# Altium PCB Main.PcbDoc (part 2 of 2)
Units mm, origin at the board's own origin, x right, y up, seen from the top; angles counter-clockwise.
Board outline 200 x 100 mm, 2 copper layers (Top Layer, Bottom Layer), stack 1.57 mm thick; 127 components, 91 nets, 374 pads, 81 vias.
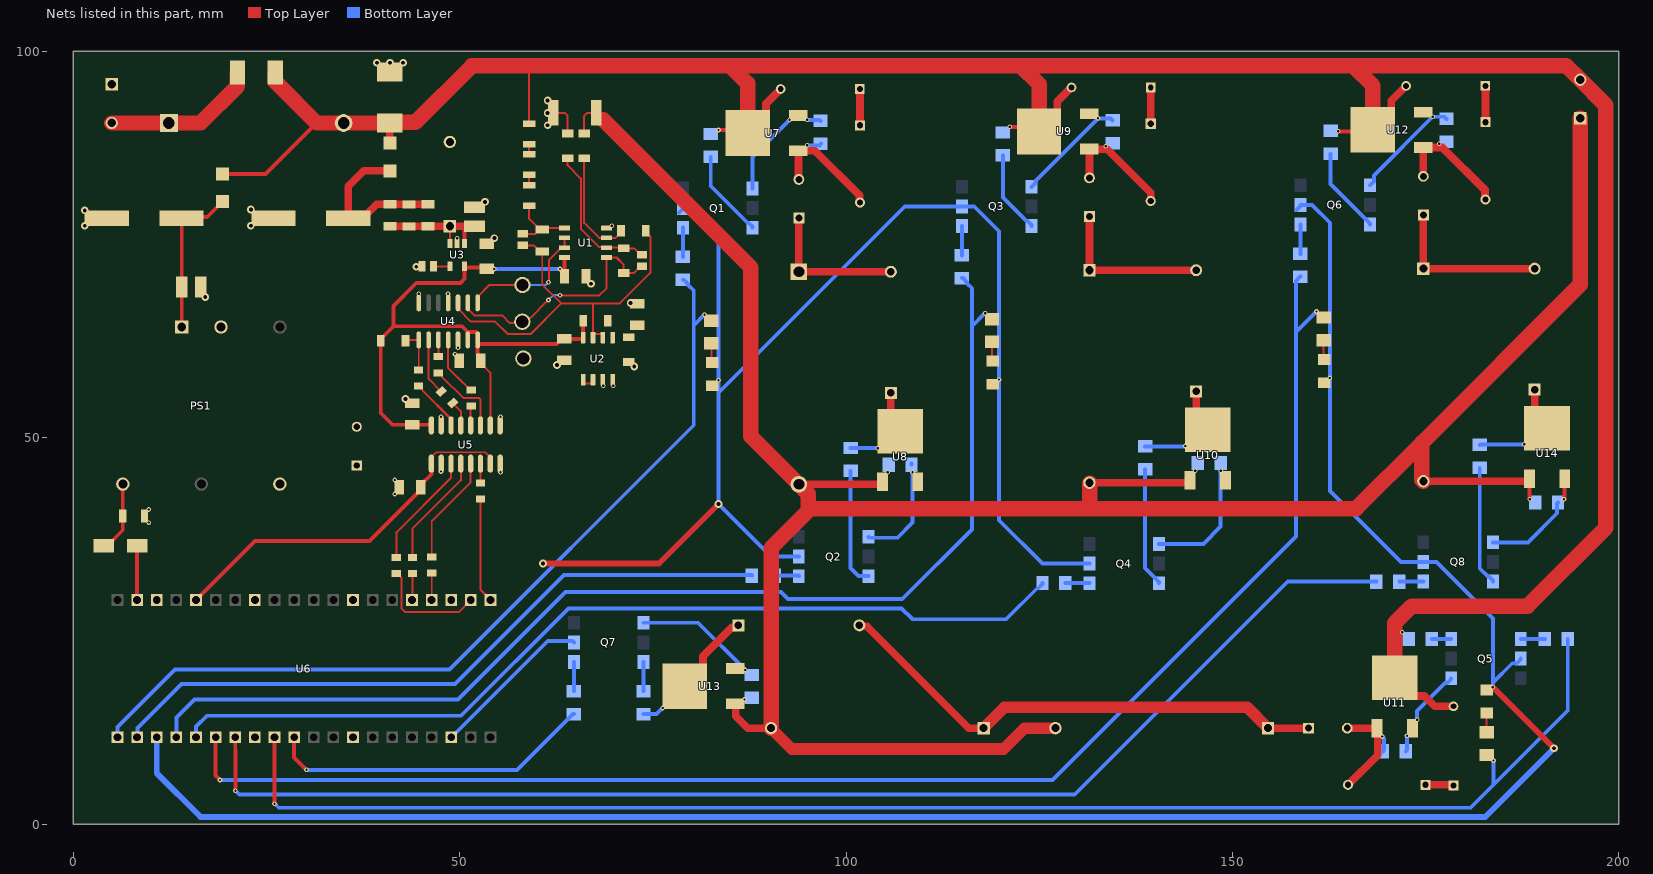
[diagram p2: the nets of this part, all layers, seen from the top]

## Part data (continued)
R15 R16 R17 R18 R19 R20 R21 R22: library part CMP-03412-000516-1, "RES SMD 33 OHM 0.1% 1/8W 0805", Manufacturer=Yageo, Manufacturer Part Number=RT0805BRD0733RL, Package=RT0805, Power Rating=0.125W, Resistance=33Ω, Temperature="-55°C to +155°C", Temperature Coefficient="25 ppm/°C", Temperature Range High=+155°C, Temperature Range Low=-55°C, Tolerance=0.0025, Voltage Rating=150V, Automotive=No, Category=Res, ComponentLink2Description=Datasheet, ComponentLink2URL=http://www.yageo.com/documents/recent/PYu-RT_1-to-0.01_RoHS_L_9.pdf, Composition="Thin Film", Device Class L1="Passive Components", Device Class L2=Resistors, Device Class L3="Chip SMD Resistors", Digikey Description="RES SMD 33 OHM 0.1% 1/8W 0805", Footprint Url=http://www.yageo.com/exep/pages/download/literatures/PYu-R_Mount_10.pdf, Height=0.6mm, Ipc Land Pattern Name=RESC200125X50, Lead Free=Yes, Mouser Description="Res Thin Film 0805 33 Ohm 0.1% 1/8W ±25ppm/°C Molded SMD SMD Paper T/R", Octopart=https://octopart.com/rt0805brd0733rl-yageo-1409436, RoHS=TRUE, Series=RT
R23 R24 R26 R27 R29 R30 R31 R32 R33 R35 R36 R38 R39 R40 R41 R42 R43 R44 R47 R48 R49 R50 R53 R54 R55 R56 R57 R58: library part CMP-26527-006451-1, "330Ω ±5% 0.25W 1206 Thick Film Chip Resistor AEC-Q200 compliant", Case/Package=1206, Max Operating Temperature=155°C, Max Power Dissipation=250mW, Min Operating Temperature=-55°C, Resistance=330R, Resistor Type="Thick Film", Temperature Coefficient=200ppm/°C, Tolerance=5%, Construction=Rectangular, Contact Plating=Tin, Depth=1.6mm, Features="Automotive AEC-Q200", Height=0.028inch, Length=0.126inch, Military Standard=Not, Mount="Surface Mount", Number of Terminations=2, Packaging="Tape and Reel", Radiation Hardening=No, RoHS Compliant=Yes, Series=RMCF, Width=0.063inch
R25 R34 R45 R46: library part CMP-02408-000025-1, "RES.WIREWOUND 1W-S 39 Ohms ±5% Axial Standard THT", Case/Package=Ceramic, Max Operating Temperature=250°C, Min Operating Temperature=-65°C, Power Rating=1W, Resistance=39R, Resistor Type=Wirewound, Temperature Coefficient=90ppm/°C, Tolerance=1%, Construction=Cylindrical, Contact Plating=Tin, Diameter=2.16mm, Lead Free="Lead Free", Length=7.14mm, Military Standard=Not, Mount="Through Hole", Packaging="Tape and Reel", Radiation Hardening=No, RoHS Compliant=Yes, Series=G, Termination=Axial
R28 R37 R51 R52: library part CMP-00030-42817933-1, "RES.WIREWOUND 2W-S 100 Ohms ±5% Axial Standard THT KNP02SJ0101A10", Case/Package=Conformal, Max Operating Temperature=155°C, Min Operating Temperature=-55°C, Operating Supply Voltage=500V, Power Rating=2W, Resistance=100kΩ, Temperature Coefficient=250ppm/°C, Tolerance=5%, Composition="Metal Film", Contact Plating=Tin, Diameter=3.9mm, Lead Free="Lead Free", Length=12mm, Military Standard=Not, Mount="Through Hole", NexarPartId=42817933, Radiation Hardening=No, REACH SVHC="No SVHC", RoHS=Compliant, Schedule B="8533210090, 8533210090", Termination=Axial, Voltage Rating=500V, Voltage Rating (DC)=500V, Width=3.9mm
TP1: library part CMP-1672-00003-4, "Test Point, Black, Through Hole, RoHS, Bulk", Colour=Black, Manufacturer=Keystone, Package Quantity=100, ComponentLink1Description="Manufacturer URL", ComponentLink1URL=http://www.keyelco.com/, ComponentLink2Description=Datasheet, ComponentLink2URL=http://www.keyelco.com/product-pdf.cfm?p=1320, Contact Material=Bronze, Contact Plating=Silver, DatasheetVersion="Rev. F, 12/2013", Height="8.12 mm", Mount="Through Hole", Mounting Technology="Through Hole", PackageDescription="1-Pin Through Hole Device, Dia 3.17 mm", PackageReference=5011, Packaging=Bulk, Pins=1, REACH SVHC="No SVHC", RoHSCompliant=true
TP2: library part CMP-1672-00005-4, "Test Point, Orange, Through Hole, RoHS, Bulk", Colour=Orange, Manufacturer=Keystone, Package Quantity=100, ComponentLink1Description="Manufacturer URL", ComponentLink1URL=http://www.keyelco.com/, ComponentLink2Description=Datasheet, ComponentLink2URL=http://www.keyelco.com/product-pdf.cfm?p=1322, Contact Material=Bronze, Contact Plating=Silver, DatasheetVersion="Rev. F, 12/2013", Height="8.12 mm", Mount="Through Hole", Mounting Technology="Through Hole", PackageDescription="1-Pin Through Hole Device, Dia 3.17 mm", PackageReference=5013, Packaging=Bulk, REACH SVHC="No SVHC", RoHSCompliant=True
TP3: library part CMP-1672-00006-4, "Test Point, Yellow, Through Hole, RoHS, Bulk", Colour=Yellow, Manufacturer=Keystone, Package Quantity=100, ComponentLink1Description="Manufacturer URL", ComponentLink1URL=http://www.keyelco.com/, ComponentLink2Description=Datasheet, ComponentLink2URL=http://www.keyelco.com/product-pdf.cfm?p=1323, Contact Material=Bronze, Contact Plating=Silver, DatasheetVersion="Rev. F, 12/2013", Height="8.12 mm", Mount="Through Hole", Mounting Technology="Through Hole", PackageDescription="1-Pin Through Hole Device, Dia 3.17 mm", PackageReference=5014, Packaging=Bulk, REACH SVHC="No SVHC", RoHSCompliant=true
U1 U2: library part CMP-0272-00762-3, "17 uA, MicroPower, Precision, Zero Drift CMOS Operational Amplifier, 1.8 to 5.5 V, -40 to 125 degC, 8-pin SOIC (D8), Green (RoHS & no Sb/Br)", Manufacturer="Texas Instruments", Total Supply Voltage(Max)(+5V is 5, +/-5V is 10)=5.5, Total Supply Voltage(Min)(+5V is 5, +/-5V is 10)=1.8, CMRR(Min)(dB)=106, Code_JEDEC=MS-012, ComponentLink1Description="Manufacturer URL", ComponentLink1URL=http://www.ti.com/, ComponentLink2Description=Datasheet, ComponentLink2URL=http://www.ti.com/general/docs/lit/getliterature.tsp?genericPartNumber=OPA2333&fileType=pdf, ComponentLink3Description="Package Specification", ComponentLink3URL=http://www.ti.com/litv/pdf/msoi002j, DatasheetVersion=SBOS351C, Eco-Plan="Green (RoHS & no Sb/Br)", IIB(Max)(pA)=200, Iq per channel(Max)(mA)=0.025, Mounting Technology="Surface Mount", Number Of Channels=2, Offset Drift(Typ)(uV/C)=0.02, PackageDescription="8-Pin Plastic Small Outline, Body 4.9 x 3.9 mm, Pitch 1.27 mm", PackageReference=D0008A, PackageVersion="4040047-3/M, 06/2011", PartNumber=OPA2333AIDR, Slew Rate(Typ)(V/us)=0.16, Sub Family="Low Offset Voltage Amplifier (<=500uV), Low Power Amp (<=500uA), Low Supply Voltage Amplifier (<=2.7V), Precision Amplifier, Zero Drift Precision Amplifier", Vio (25C)(Max)(mV)=0.01
U3: library part CMP-0758-00080-2, "Single Output Low Noise LDO, 150 mA, Fixed 3.3 V Output, 1.5% Tolerance, 2.2 to 16 V Input, Low IQ, 5-Pin SOT-23 (DBV), -40 to 125 degC, Green (RoHS & no Sb/Br), Tape and Reel", Manufacturer="Texas Instruments", Operating Temperature Range (degC)="-40 to 125", Accuracy (%)=1.5, ComponentLink1Description="Manufacturer URL", ComponentLink1URL=http://www.ti.com/, ComponentLink2Description=Datasheet, ComponentLink2URL=http://www.ti.com/lit/ds/symlink/lp2985-50.pdf, ComponentLink3Description="Package Specification", ComponentLink3URL=http://www.ti.com/litv/pdf/mpds018j, DatasheetVersion=SLVS522N, Fixed Output Options (V)=3.3, Iout (Max) (A)=0.15, Iq (Typ) (mA)=0.85, Mounting Technology="Surface Mount", Output Options="Fixed Output", PackageDescription="5-Pin Plastic Small Outline, Body 2.9 x 1.6 mm, Pitch 0.95 mm", PackageReference=DBV0005A, PackageVersion=4073253-4/L, Packing="Tape and Reel", PartNumber=LP2985-33DBVR, RoHS=TRUE, Vdo (Typ) (mV)=280, Vin (V)="2.2 to 16"
U4: library part CMP-0188-00363-2, "2.7V 4-Channel/8-Channel 12-Bit A/D Converters with SPI Serial Interface, 14-Pin SOIC 150mil, C Performance Grade, Industrial Temperature, Tape and Reel", Code_IPC=SOIC127P600-14, Code_JEDEC=MS-012-AB, ComponentLink1Description="Manufacturer URL", ComponentLink1URL=http://www.microchip.com/, ComponentLink2Description=Datasheet, ComponentLink2URL=http://ww1.microchip.com/downloads/en/DeviceDoc/21298e.pdf, ComponentLink3Description="Package Specification", ComponentLink3URL=http://www.microchip.com/stellent/groups/techpub_sg/documents/packagingspec/en012702.pdf, DatasheetVersion="revE, Sep-2008", PackageDescription="14-Lead Plastic Small Outline (SL) - Narrow, 3.90mm Body [SOIC]", PackageReference=SOIC-SL14, PackageVersion="revBB, Aug-2009", RevisionNote="URLs added."
U5: library part CMP-0512-00190-1, "Low-Power Quad-Channel Digital Isolator, 150 Mbps, 3.75 kVRMS Isolation Rating, -40 to 125 degC, 16-pin SOIC", Isolation Rating (kV)=3.75, Manufacturer="Silicon Labs", 10kV surge=FALSE, AEC-Q100=FALSE, Channel Type=Unidirectional, Code_IPC=J-STD-020, Code_JEDEC=MS-012, ComponentLink1Description="Manufacturer URL", ComponentLink1URL=http://www.silabs.com/, ComponentLink2Description=Datasheet, ComponentLink2URL=http://www.silabs.com/Support%20Documents/TechnicalDocs/Si864x.pdf, ComponentLink3Description="Package Specification", ComponentLink3URL=http://www.silabs.com/Support%20Documents/TechnicalDocs/si2401.pdf, DatasheetVersion="Rev. 1.5", Enable Control=TRUE, Maximum Data Rate (Mbps)=150, Maximum Propagation Delay (ns)=13, Mounting Technology="Surface Mount", PackageDescription="16-Pin Small-Outline Integrated Circuit, Body 9.9 x 3.9 mm, Pitch 1.27 mm", PackageReference=SOIC-16-NB, PartNumber=Si8641BC-B-IS1, Sub-Family=Isolators
U6: library part CMP-007-000000-1, "Raspberry Pi Board, Arm Cortex-M0+; Core Architecture:Arm; Core Sub-Architecture:Cortex-M0+; Kit Contents:Raspberry Pi Pico Board; No. Of Bits:32Bit; Silicon Core Number:Rp2040; Silicon Manufacturer:Raspberry Pi", Package=None, Check_prices=https://www.snapeda.com/parts/RASPBERRY%20PI%20PICO/Raspberry+Pi/view-part/?ref=eda, Component Type=Standard, Design Item ID=RASPBERRY_PI_PICO, MF="Raspberry Pi", MP="RASPBERRY PI PICO", Pin Count=40, SnapEDA_Link=https://www.snapeda.com/parts/RASPBERRY%20PI%20PICO/Raspberry+Pi/view-part/?ref=snap, Source=RASPBERRY_PI_PICO.SchLib
U7 U8 U9 U10 U11 U12 U13 U14: library part CMP-070-000000-1, "TRIAC Logic - Sensitive Gate 600 V 4 A Surface Mount DPAK", Package="TO-252-3 WeEn Semiconductors", Check_prices=https://www.snapeda.com/parts/BT136S-600E,118/WeEn+Semiconductors/view-part/?ref=eda, Component Type=Standard, Design Item ID=BT136S-600E,118, MF="WeEn Semiconductors", MP=BT136S-600E,118, Pin Count=3, SnapEDA_Link=https://www.snapeda.com/parts/BT136S-600E,118/WeEn+Semiconductors/view-part/?ref=snap, Source=BT136S-600E,118.SchLib

## Via types
v1: diameter 0.6, hole 0.3, Top Layer to Bottom Layer, 59 vias
v2: diameter 1, hole 0.5, Top Layer to Bottom Layer, 22 vias

## Nets (pads, with @x,y where several pads share a name; then routed paths per layer and width w, separated by ;. In a path a pad name is that pad's centre, name@x,y a point inside that pad or via, vN(x,y) a via of type N, cw(c..) or ccw(c..) an arc to the next point about the centre after c; other vN are vias at no path point)
+1V65: C25.1 R5.1 R7.1 U2.6 U2.7 U4.3 | length 52.8
  Top Layer w0.254: U4.3@49.802,67.437 49.802,66.637 51.439,65 54.616,65 56.216,63.4 59.2,63.4 63.15,67.35 ; C25.1@58.165,74.86 59.586,74.86 60.373,74.073 R7.1@60.7,74.073 60.7,69.8 63.15,67.35 ; U2.7@67.265,62.925 U2.7@67.265,63.227 ; U2.6@68.535,62.925 68.535,63.227 68.362,63.4 67.438,63.4 U2.7@67.265,63.227 ; R5.1@74.079,76.756 74.079,76.506 74.452,76.133 74.551,76.133 74.7,75.985 74.7,71.3 70.75,67.35 67.3,67.35 ; 63.15,67.35 67.3,67.35 ; U2.7@67.265,63.227 67.265,67.315 67.3,67.35
+3V3_A: C1.1 C3.1 C4.2 C8.1 C10.1 R10.2 R59.2 U1.8 U2.8 U3.5 U4.13 U4.14 U5.10 U5.16 | length 89.7
  Top Layer w0.254: C10.1@52.739,59.928 52.739,59.608 53.975,58.372 U5.10@53.975,51.575
  Top Layer w0.5: U5.16@46.355,51.575 46.277,51.653 C8.1@43.871,51.653 41.347,51.653 39.803,53.197 R59.2@39.803,62.521 39.803,62.771 41.432,64.4 ; U3.5@50.642,72.085 50.717,72.01 53.383,72.01 C4.2@53.533,71.859 ; U3.5@50.642,72.16 50.642,70.542 50.1,70 44.4,70 41.432,67.032 41.432,64.4 ; U4.13@51.118,61.818 51.072,61.864 U4.13@51.072,62.637 51.053,62.656 U4.13@51.053,63.647 ; U4.14@52.296,61.818 U4.14@52.342,61.864 ; U4.14@52.342,61.855 52.342,60.901 52.379,60.864 52.379,60.288 C10.1@52.739,59.928 ; C1.1@63.575,70.863 U1.8@63.575,73.295 ; R10.2@65.991,65.129 R10.2@65.991,65.129 65.993,62.816 65.945,62.768 63.241,62.768 62.573,62.1 52.388,62.1 52.342,62.146 52.342,63.41 52.105,63.647 U4.13@51.053,63.647 ; 41.432,64.4 50.3,64.4 U4.13@51.053,63.647
  Bottom Layer w0.5: v1(54.5,71.8) v1(63,71.8)
+3V3_D: C9.1 U5.1 U5.7 U6.3V3 | length 48.4
  Top Layer w0.254: U5.1@46.355,46.625 46.355,47.45 47.005,48.1 53.325,48.1 53.975,47.45 U5.7@53.975,46.625
  Top Layer w0.5: U6.3V3@15.9,28.99 23.51,36.6 38.333,36.6 45.004,43.271 C9.1@45.004,43.591 ; C9.1@45.004,43.911 46.346,45.253 46.346,46.616 U5.1@46.355,46.625
+5V: C11.1 D4.1 PS1.6 | length 9.3
  Top Layer w0.5: D4.1@3.98,36 4.43,36 6.43,38 C11.1@6.43,39.861 PS1.6@6.43,43.98
AGND: C1.2 C2.2 C3.2 C4.1 C5.2 C6.2 C7.2 C8.2 C10.2 C12.2 C13.2 C23.2 D1.2 D3.2 J1.1 PS1.2 R2.1 R8.1 R11.1 TP1.1 U1.4 U2.3 U2.4 U3.2 U4.4 U4.7 U4.12 U5.9 U5.15 | length 4.3
  Top Layer w0.254: R2.1@62.125,92 63.6,92 63.975,91.625 R8.1@63.975,89.346
  other v1: 47.6,52.7 55.3,52.7 68.6,56.7 69.9,56.7 49.4,60.8 49.8,61.6 44.7,68.6 48.5,68.6 49.7,75.8 69.7,77.4
  other v2: 43,55 72.6,59.2 62.6,59.4 72.134,67.4 17.1,68.2 67,69.9 44.4,72.1 54.5,75.8 1.5,77.4 23,77.4 1.5,79.4 23,79.5 53.3,80.5 61.4,90.4 61.4,92 61.4,93.6 39.3,98.5 41,98.5 42.7,98.5
CAP0_EN: R23.1 R26.2 U6.GP0 | length 113.5
  Bottom Layer w0.5: U6.GP0@5.74,11.21 5.74,12.54 13.2,20 48.7,20 80.3,51.6 80.3,64.5 ; R23.1@78.895,70.421 79.022,70.421 79.574,69.869 79.574,69.742 80.3,69.016 80.3,64.5 ; v1(81.7,65.9) 80.3,64.5
CAP0_RST: R30.1 U6.GP1 | length 89
  Bottom Layer w0.5: U6.GP1@8.28,11.21 8.321,11.251 8.321,12.421 14,18.1 49.4,18.1 63.5,32.2 87.754,32.2 R30.1@87.823,32.131
CAP1_EN: R32.1 R35.2 U6.GP2 | length 151.8
  Bottom Layer w0.5: U6.GP2@13.36,11.21 13.36,13.76 15.7,16.1 49.8,16.1 63.7,30 91.6,30 92.5,29.1 107.284,29.1 116.3,38.116 116.3,64.4 ; R32.1@114.995,70.621 115.122,70.621 115.674,70.069 115.674,69.942 116.3,69.316 116.3,64.4 ; v1(118,66.1) 116.3,64.4
CAP1_RST: R39.1 U6.GP3 | length 119.8
  Bottom Layer w0.5: U6.GP3@15.9,11.21 15.9,12.6 17.3,14 50.2,14 64.1,27.9 107.2,27.9 108.6,26.5 120.738,26.5 124.744,30.505 124.871,30.505 125.423,31.057 R39.1@125.423,31.184
CAP2_EN: R43.1 R48.2 U6.GP4 | length 195.7
  Top Layer w0.5: U6.GP4@18.44,11.21 18.44,6.287 19,5.727 v1(19,5.7)
  Bottom Layer w0.5: v1(19,5.7) 126.7,5.7 158.2,37.2 158.2,63.642 ; R43.1@158.795,70.821 158.752,70.821 158.2,70.269 158.2,63.642 ; v1(160.875,66.316) 158.2,63.642
CAP2_RST: R56.1 U6.GP5 | length 166.2
  Top Layer w0.5: U6.GP5@20.98,11.21 20.98,9.52 21,9.5 v1(21,4.3)
  Bottom Layer w0.5: v1(21,4.3) 21.5,3.8 129.6,3.8 157.16,31.36 R56.1@168.623,31.36
CAP3_EN: R41.1 R47.2 U6.GP6 | length 193.7
  Top Layer w0.5: v1(26.06,2.64) U6.GP6@26.06,11.21
  Bottom Layer w0.5: v1(26.06,2.64) 26.6,2.1 180.8,2.1 183.775,5.075 ; v1(183.775,8.216) 183.775,5.075 ; R41.1@193.382,23.94 193.382,14.682 183.775,5.075
CAP3_RST: R54.1 U6.GP7 | length 42.5
  Top Layer w0.5: U6.GP7@28.6,11.21 28.6,8.6 v1(30.2,7)
  Bottom Layer w0.5: v1(30.2,7) 57.447,7 64.668,14.221 R54.1@64.795,14.221
CLK_A: R19.1 U4.11 | length 7.8
  Top Layer w0.254: U4.11@48.532,62.637 48.532,58.968 49.7,57.8 49.733,57.8 51.354,56.179 R19.1@51.504,56.179
CLK_D: R20.1 U5.5 | length 14.2
  Top Layer w0.254: R20.1@46.4,34.55 46.4,39.2 51.435,44.235 U5.5@51.435,46.625
CS_A: R15.1 R59.1 U4.8 | length 5.7
  Top Layer w0.254: R59.1@43.003,62.521 43.119,62.637 U4.8@44.722,62.637 44.722,58.772 R15.1@44.7,58.75
CS_D: R21.1 U5.3 | length 15.1
  Top Layer w0.254: R21.1@41.813,34.51 41.813,37.687 41.8,37.7 48.895,44.795 U5.3@48.895,46.625
DGND: C9.2 C11.2 C23.1 D6.1 D7.1 D8.1 D9.1 PS1.4 Q1.2 Q2.2 Q3.2 Q4.2 Q5.2 Q6.2 Q7.2 Q8.2 U5.2 U5.8 U6.AGND U6.GND U6.GND2 U6.GND3 U6.GND4 U6.GND5 U6.GND6 U6.GND7 | length 485.8
  Top Layer w0.75: v2(60.8,33.7) 75.8,33.7 v2(83.5,41.4) ; v1(183.7,17.7) v2(191.6,9.8)
  Bottom Layer w0.5: U6.GND7@48.92,11.21 61.41,23.7 64.595,23.7 Q7.2@64.795,23.5 ; Q1.2@78.385,79.091 78.895,79.601 Q1.2@78.895,79.7 80.2,79.7 83.5,76.4 v1(83.5,57.4) 83.5,55.8 ; Q2.2@93.9,34.61 90.29,34.61 v2(83.5,41.4) 83.5,55.8 ; Q4.2@131.5,33.7 125.4,33.7 119.8,39.3 v1(119.8,57.5) 119.8,76.7 116.6,79.9 Q3.2@114.995,79.9 107.6,79.9 83.5,55.8 ; Q6.2@158.285,79.46 158.795,79.97 Q6.2@158.795,80.1 160.3,80.1 162.6,77.8 v1(162.6,57.7) 162.6,43.1 171.8,33.9 Q8.2@174.7,33.9 176.4,33.9 183.7,26.6 183.7,18.3 ; v1(183.7,17.7) 183.7,18.3 ; Q5.2@187.305,21.4 187.305,21.307 186.795,20.797 186.197,20.797 183.7,18.3
  Bottom Layer w0.75: U6.GND4@10.82,11.21 10.82,6.58 16.5,0.9 182.7,0.9 v2(191.6,9.8)
  other v1: 9.8,39 9.8,40.7 41.6,42.7 41.6,44.5 55.3,45.5 47.6,45.6
I_BUF: C24.2 R9.2 TP3.1 U1.1 U4.2 | length 32
  Top Layer w0.254: U4.2@51.072,67.437 51.072,66.637 51.909,65.8 55.5,65.8 56.5,64.8 57.933,64.8 TP3.1@58.116,64.983 58.615,64.983 59.09,65.457 59.157,65.457 v1(61.5,67.8) ; v1(63,68.4) 68.093,68.4 69.025,69.332 U1.1@69.025,73.295 70.305,73.295 71.229,72.371 R9.2@71.229,71.286 ; R9.2@70.979,71.286 R9.2@71.229,71.286 ; C24.2@73.608,72.159 73.408,72.159 72.536,71.286 R9.2@71.229,71.286
  Bottom Layer w0.254: v1(61.5,67.8) 62.137,68.437 62.963,68.437 v1(63,68.4)
L: D1.1 D2.2 D5.2 F1.2 F2.2 J2.2 R1.2 R24.2 R25.2 R33.2 R34.2 R42.2 R44.2 R45.2 R46.2 U7.MB U9.MB U11.MB U12.MB | length 372.5
  Top Layer w0.254: 58.8,98.1 59,97.9 R1.2@59,90.6
  Top Layer w0.5: D5.2@19.349,84.106 24.905,84.106 31.5,90.7 ; v1(83.5,89.8) 86.882,89.8 U7.MB@87.278,89.404 ; v1(121.2,90.2) 124.379,90.2 U9.MB@124.975,89.604 ; v1(163.675,89.616) 167.987,89.616 U12.MB@168.175,89.804
  Top Layer w1: D2.2@40.98,88.09 D1.1@40.98,90.7 ; U7.MB@87.278,89.404 89.653,91.779 89.653,93.208 R25.2@91.545,95.1 ; U9.MB@124.975,89.604 127.35,91.979 127.35,93.477 R34.2@129.173,95.3 ; U12.MB@168.175,89.804 170.55,92.179 170.55,93.578 R46.2@172.472,95.5 ; U11.MB@171,18.925 173.375,16.55 174.85,16.55 176.173,15.228 R45.2@178.6,15.228
  Top Layer w2: F2.2@26.151,97.229 26.151,96.049 31.5,90.7 F1.2@35,90.7 D1.1@40.98,90.7 41.05,90.77 44.27,90.77 51.6,98.1 58.8,98.1 85,98.1 ; U7.MB@87.278,89.404 87.278,95.822 85,98.1 ; U9.MB@124.975,89.604 124.975,95.725 122.6,98.1 ; U12.MB@168.175,89.804 168.175,95.525 165.6,98.1 ; U11.MB@171,18.925 171,24.816 171,26 173.2,28.2 188.2,28.2 198.3,38.3 198.3,93 J2.2@195,96.3 193.2,98.1 165.6,98.1 ; 85,98.1 122.6,98.1 ; 122.6,98.1 165.6,98.1
  other v1: 171.975,24.816
MISO_A: R18.2 U5.11 | length 10.3
  Top Layer w0.254: R18.2@47.252,58.358 47.402,58.358 47.725,58.035 47.725,57.885 50.516,55.095 52.556,55.095 52.705,54.946 U5.11@52.705,51.575
MISO_D: R17.2 U6.GP16 | length 13.6
  Top Layer w0.254: R17.2@52.714,42.021 52.714,30.276 U6.GP16@54,28.99
MOSI_A: R16.1 U4.9 | length 7.4
  Top Layer w0.254: U4.9@45.992,62.637 45.992,57.598 R16.1@47.639,55.951
MOSI_D: R22.1 U5.4 | length 14.7
  Top Layer w0.254: R22.1@43.902,34.51 43.902,38.202 50.165,44.465 U5.4@50.165,46.625
N: C15.2 C19.2 C20.2 C21.2 C22.2 J2.1 R2.2 R3.2 R31.1 R40.1 R57.1 R58.1 U8.1 U10.1 U13.1 U14.1 | length 324.1
  Top Layer w0.254: R3.2@66.129,89.346 66.129,91.629 66.5,92 R2.2@67.675,92
  Top Layer w0.5: U14.1@188.415,44.675 188.415,42.103 188.475,42.044 v1(188.475,42.016)
  Top Layer w1: U13.1@85.646,15.562 85.753,15.455 85.753,13.947 87.3,12.4 C20.2@90.3,12.4 ; C15.2@93.9,43.95 104.515,43.95 104.715,44.15 U8.1@104.715,44.275 ; C19.2@131.5,44.15 144.315,44.15 144.515,44.35 U10.1@144.515,44.475 ; C22.2@174.7,44.35 188.215,44.35 188.415,44.55 U14.1@188.415,44.675
  Top Layer w1.5: C20.2@90.3,12.4 93,9.7 120.4,9.7 123.1,12.4 C21.2@127.1,12.4
  Top Layer w2: 68.607,91.093 87.7,72 87.7,50.15 C15.2@93.9,43.95 93.9,43.909 95.1,42.709 95.1,40.5 90.3,35.7 C20.2@90.3,12.4 ; 95.1,40.8 131.533,40.8 ; C19.2@131.533,44.117 131.533,40.8 ; C22.2@174.7,44.35 174.5,44.55 174.5,49.3 ; J2.1@195,91.3 195,69.8 174.5,49.3 ; 131.533,40.8 166,40.8 174.5,49.3
  other v1: 86.875,16.116 105.4,45.5 145.175,45.716
NetC2_1: C2.1 R10.1 R11.2 U2.5 | length 1.1
  Top Layer w0.254: R11.2@71.841,62.925 R11.2@71.926,63.01 ; C2.1@72.193,64.069 72.676,64.552 C2.1@72.996,64.552
NetC5_1: C5.1 D2.1 R12.1 R13.1 R14.1 | length 21.4
  Top Layer w1: D2.1@40.98,84.51 37.61,84.51 35.6,82.5 C5.1@35.6,78.4 36.1,78.9 38,78.9 39.29,80.19 R12.1@40.991,80.19 40.993,80.191 43.457,80.191 45.921,80.191 R14.1@45.923,80.193
NetC6_1: C6.1 U3.4 | length 2.1
  Top Layer w0.254: C6.1@46.638,72.16 U3.4@48.742,72.16
NetC7_1: C7.1 D3.1 R12.2 R13.2 R14.2 U3.1 U3.3 | length 15.4
  Top Layer w0.254: U3.3@48.742,75.11 D3.1@48.742,77.339
  Top Layer w0.5: 50.6,77.337 50.642,77.295 U3.1@50.642,75.11
  Top Layer w1: R12.2@40.991,77.336 40.993,77.337 50.6,77.337 51.953,77.337 C7.1@51.955,77.339
NetC12_1: C12.1 C13.1 D5.1 PS1.1 | length 20.3
  Top Layer w0.5: PS1.1@14.05,64.3 C12.1@14.05,69.494 C13.1@14.05,78.4 14.184,78.534 17.357,78.534 18.749,79.926 18.759,79.926 19.349,80.516 D5.1@19.349,80.526
NetC14_1: C14.1 R25.1 | length 4.7
  Top Layer w1: C14.1@101.8,90.4 R25.1@101.8,95.1
NetC14_2: C14.2 L1.2 R27.2 U7.1 | length 17
  Top Layer w1: L1.2@93.9,83.4 93.851,83.449 93.851,87.07 U7.1@93.803,87.119 95.981,87.119 101.743,81.357 101.743,80.457 C14.2@101.8,80.4
  Bottom Layer w0.5: v1(95,87.8) 96.576,87.8 R27.2@96.8,88.024
NetC15_1: C15.1 L1.1 R28.2 | length 18.8
  Top Layer w1: L1.1@93.9,78.4 C15.1@93.9,71.45 R28.2@105.8,71.45
NetC16_1: C16.1 R34.1 | length 4.7
  Top Layer w1: C16.1@139.428,90.6 R34.1@139.428,95.3
NetC16_2: C16.2 L2.2 R36.2 U9.1 | length 15.1
  Top Layer w1: L2.2@131.5,83.6 U9.1@131.5,87.319 133.781,87.319 139.428,81.673 C16.2@139.428,80.6
  other v1: 133.6,87.7
NetC17_1: C17.1 R45.1 | length 3.7
  Top Layer w1: C17.1@174.958,5.071 178.475,5.071 R45.1@178.475,4.848
NetC17_2: C17.2 L3.2 R49.2 U11.1 | length 14.9
  Top Layer w1: L3.2@164.854,12.4 U11.1@168.715,12.4 168.8,12.315 168.8,8.913 C17.2@164.958,5.071
  Bottom Layer w0.5: v1(169.4,11.327) 169.4,11.3 169.625,11.075 169.625,9.55 R49.2@169.474,9.4
NetC18_1: C18.1 R46.1 | length 4.7
  Top Layer w1: C18.1@182.728,90.8 R46.1@182.728,95.5
NetC18_2: C18.2 L4.2 R50.2 U12.1 | length 15.2
  Top Layer w1: L4.2@174.7,83.8 U12.1@174.7,87.519 177.181,87.519 182.67,82.03 182.67,80.857 C18.2@182.728,80.8
  other v1: 176.775,88.016
NetC19_1: C19.1 L2.1 R37.2 | length 20.7
  Top Layer w1: L2.1@131.5,78.6 C19.1@131.5,71.65 R37.2@145.3,71.65
NetC20_1: C20.1 C21.1 L3.1 R51.2 | length 65.9
  Top Layer w1: R51.2@101.73,25.7 101.835,25.595 102.705,25.595 115.9,12.4 C20.1@117.8,12.4 ; C21.1@154.6,12.4 L3.1@159.854,12.4
  Top Layer w1.5: C20.1@117.8,12.4 120.5,15.1 151.9,15.1 C21.1@154.6,12.4
NetC22_1: C22.1 L4.1 R52.2 | length 21.3
  Top Layer w1: L4.1@174.7,78.8 C22.1@174.7,71.85 R52.2@189.1,71.85
NetC24_1: C24.1 R8.2 R9.1 U1.2 | length 19.2
  Top Layer w0.254: R8.2@63.975,86.146 63.975,85.225 65.7,83.5 65.7,77 68.068,74.632 68.958,74.632 U1.2@69.025,74.565 71.15,74.565 R9.1@71.229,74.486 72.58,74.486 73.408,73.659 C24.1@73.608,73.659
NetC25_2: C25.2 R6.1 R7.2 U1.5 | length 9.4
  Top Layer w0.254: C25.2@58.165,76.36 59.806,76.36 R7.2@60.373,76.927 ; R6.1@59,80.014 59,78.3 R7.2@60.373,76.927 ; U1.5@63.575,77.105 60.878,77.105 R7.2@60.7,76.927 R7.2@60.373,76.927
NetD4_2: D4.2 U6.VSYS | length 7
  Top Layer w0.5: U6.VSYS@8.28,28.99 D4.2@8.28,36
NetD6_2: D6.2 R26.1 | length 2.5
  Top Layer w0.254: R26.1@82.584,62.181 82.584,59.816 D6.2@82.7,59.7
NetD7_2: D7.2 R35.1 | length 2.5
  Top Layer w0.254: R35.1@118.891,62.381 118.891,60.009 D7.2@119,59.9
NetD8_2: D8.2 R47.1 | length 2.5
  Top Layer w0.254: R47.1@182.9,11.876 D8.2@182.9,14.356
NetD9_2: D9.2 R48.1 | length 2.5
  Top Layer w0.254: R48.1@161.799,62.581 161.799,60.201 D9.2@161.9,60.1
NetF1_1: F1.1 F2.1 J1.2 | length 20
  Top Layer w2: J1.2@5,90.7 16.5,90.7 21.249,95.449 F2.1@21.249,97.229
NetQ1_1: Q1.1 R23.2 | length 3.8
  Bottom Layer w0.5: R23.2@78.895,73.372 Q1.1@78.895,77.16
NetQ1_4: Q1.4 R27.1 U7.3 | length 12.6
  Bottom Layer w0.5: Q1.4@87.905,82.24 87.905,86.305 v1(92.7,91.1) ; v1(95,91.1) 96.576,91.1 R27.1@96.7,90.976
NetQ1_6: Q1.6 R24.1 | length 11.5
  Bottom Layer w0.5: R24.1@82.5,86.324 82.5,82.565 87.265,77.8 87.395,77.8 87.905,77.29 Q1.6@87.905,77.16
NetQ2_1: Q2.1 R30.2 | length 3.2
  Bottom Layer w0.5: R30.2@90.774,32.131 93.839,32.131 Q2.1@93.9,32.07
NetQ2_4: Q2.4 R31.2 U8.3 | length 13.2
  Bottom Layer w0.5: Q2.4@102.91,37.15 103.019,37.042 106.642,37.042 108.6,39 v1(108.6,45.5) ; R31.2@108.476,46.5 R31.2@108.476,46.627
NetQ2_6: Q2.6 R29.2 | length 15.3
  Bottom Layer w0.5: R29.2@100.6,45.7 100.6,33.1 101.63,32.07 Q2.6@102.91,32.07
NetQ3_1: Q3.1 R32.2 | length 3.8
  Bottom Layer w0.5: R32.2@114.995,73.572 Q3.1@114.995,77.36
NetQ3_4: Q3.4 R36.1 U9.3 | length 14.4
  Bottom Layer w0.5: Q3.4@124.005,82.44 124.515,82.95 124.515,83.215 v1@132.581,91.281 ; v1(132.6,91.3) 134.23,91.3 R36.1@134.5,91.03
NetQ3_6: Q3.6 R33.1 | length 10.8
  Bottom Layer w0.5: R33.1@120.3,86.524 120.3,81.065 123.365,78 123.495,78 124.005,77.49 Q3.6@124.005,77.36
NetQ4_1: Q4.1 R39.2 | length 3.1
  Bottom Layer w0.5: R39.2@128.374,31.184 131.476,31.184 Q4.1@131.5,31.16
NetQ4_4: Q4.4 R40.2 U10.3 | length 16.1
  Bottom Layer w0.5: Q4.4@140.51,36.24 146.24,36.24 148.475,38.475 v1(148.475,45.716)
NetQ4_6: Q4.6 R38.2 | length 15.5
  Bottom Layer w0.5: R38.2@138.7,45.9 138.7,33.1 140.51,31.29 Q4.6@140.51,31.16
NetQ5_1: Q5.1 R41.2 | length 3.1
  Bottom Layer w0.5: Q5.1@187.305,23.94 R41.2@190.431,23.94
NetQ5_4: Q5.4 R49.1 U11.3 | length 9.4
  Bottom Layer w0.5: R49.1@172.426,9.4 172.575,9.549 v1(172.575,11.416) ; v1(173.9,13.5) 173.9,14.6 177.52,18.22 177.785,18.22 178.295,18.73 Q5.4@178.295,18.86
NetQ5_6: Q5.6 R42.1 | length 2.5
  Bottom Layer w0.5: R42.1@175.779,23.94 Q5.6@178.295,23.94
NetQ6_1: Q6.1 R43.2 | length 3.8
  Bottom Layer w0.5: R43.2@158.795,73.772 Q6.1@158.795,77.56
NetQ6_4: Q6.4 R50.1 U12.3 | length 14.1
  Bottom Layer w0.5: Q6.4@167.805,82.64 168.315,83.15 168.315,83.915 v1(175.9,91.5) ; v1@175.927,91.5 177.43,91.5 R50.1@177.7,91.23
NetQ6_6: Q6.6 R44.1 | length 11.3
  Bottom Layer w0.5: R44.1@162.7,86.724 162.7,82.795 167.805,77.69 Q6.6@167.805,77.56
NetQ7_1: Q7.1 R54.2 | length 3.8
  Bottom Layer w0.5: R54.2@64.795,17.172 Q7.1@64.795,20.96
NetQ7_4: Q7.4 R57.2 U13.3 | length 15.7
  Bottom Layer w0.5: Q7.4@73.805,26.04 80.851,26.04 v1(86.975,19.916)
NetQ7_6: Q7.6 R53.2 | length 3.8
  Bottom Layer w0.5: R53.2@73.805,17.172 Q7.6@73.805,20.96
NetQ8_1: Q8.1 R56.2 | length 3.1
  Bottom Layer w0.5: R56.2@171.574,31.36 Q8.1@174.7,31.36
NetQ8_4: Q8.4 R58.2 U14.3 | length 14
  Top Layer w0.5: v1(192.9,42) 192.9,42.027 192.985,42.112 U14.3@192.985,44.675
  Bottom Layer w0.5: Q8.4@183.71,36.44 188.24,36.44 192.014,40.214 192.014,41.488 R58.2@192.126,41.6
NetQ8_6: Q8.6 R55.2 | length 15.5
  Bottom Layer w0.5: R55.2@182,46.1 182,33.07 183.07,32 183.2,32 183.71,31.49 Q8.6@183.71,31.36
NetR1_1: R1.1 R4.2 | length 1.3
  Top Layer w0.254: R4.2@59,86.634 R1.1@59,87.946
NetR3_1: R3.1 R5.2 U1.3 | length 14.5
  Top Layer w0.254: R3.1@66.129,86.146 66.129,77.771 68.065,75.835 70.208,75.835 70.879,76.506 R5.2@70.879,76.756
NetR4_1: R4.1 R6.2 | length 1.3
  Top Layer w0.254: R6.2@59,82.668 R4.1@59,83.98
NetR15_2: R15.2 U5.14 | length 6.9
  Top Layer w0.254: R15.2@44.7,56.65 44.85,56.65 45.173,56.327 45.173,56.122 48.895,52.4 U5.14@48.895,51.575
NetR16_2: R16.2 U5.13 | length 3.3
  Top Layer w0.254: R16.2@49.124,54.466 50.165,53.425 U5.13@50.165,51.575
NetR17_1: R17.1 U5.6 | length 2.5
  Top Layer w0.254: U5.6@52.705,46.625 52.705,44.231 R17.1@52.812,44.124
NetR18_1: R18.1 U4.10 | length 2.2
  Top Layer w0.254: R18.1@47.252,60.458 47.262,60.468 U4.10@47.262,62.637
NetR19_2: R19.2 U5.12 | length 2.5
  Top Layer w0.254: U5.12@51.435,51.575 51.435,54.01 R19.2@51.504,54.079
NetR20_2: R20.2 U6.GP18 | length 3.5
  Top Layer w0.254: U6.GP18@46.38,28.99 46.4,29.01 R20.2@46.4,32.45
NetR21_2: R21.2 U6.GP17 | length 14.7
  Top Layer w0.254: R21.2@41.813,32.41 41.963,32.41 42.485,31.889 42.485,27.915 43,27.4 49.87,27.4 U6.GP17@51.46,28.99
NetR22_2: R22.2 U6.GP19 | length 3.4
  Top Layer w0.254: U6.GP19@43.84,28.99 43.902,29.052 R22.2@43.902,32.41
NetR28_1: R28.1 R29.1 U8.MB | length 9
  Top Layer w1: R28.1@105.8,55.79 105.8,52 U8.MB@107,50.8
  Bottom Layer w0.5: R29.1@100.6,48.651 104.022,48.651 104.073,48.6 v1(104.1,48.6)
NetR37_1: R37.1 R38.1 U10.MB | length 10.8
  Top Layer w1: R37.1@145.3,55.99 145.3,52.5 U10.MB@146.8,51
  Bottom Layer w0.5: R38.1@138.7,48.851 143.824,48.851 143.873,48.9 v1(143.9,48.9)
NetR51_1: R51.1 R53.1 U13.MB | length 13.9
  Top Layer w1: U13.MB@79.121,17.847 81.496,20.222 81.496,21.696 85.225,25.425 85.795,25.425 R51.1@86.07,25.7
  Bottom Layer w0.5: R53.1@73.805,14.221 75.479,14.221 v1(76.275,15.016)
NetR52_1: R52.1 R55.1 U14.MB | length 11.4
  Top Layer w1: R52.1@189.1,56.19 189.1,52.8 U14.MB@190.7,51.2
  Bottom Layer w0.5: R55.1@182,49.051 182.065,49.116 v1@187.748,49.116
  other v1: 187.775,49.116
NetU2_1: U2.1 U2.2 | length 2
  Top Layer w0.254: U2.1@65.995,57.475 65.995,57.173 66.168,57 67.092,57 67.265,57.173 U2.2@67.265,57.475
V_BUF: TP2.1 U1.6 U1.7 U4.1 | length 17.8
  Top Layer w0.254: U4.1@52.342,67.437 52.342,68.237 53.842,69.737 TP2.1@58.142,69.737 ; v1(61.5,70.1) 61.6,70.2 61.6,73.015 63.15,74.565 U1.7@63.575,74.565 U1.6@63.575,75.835 U1.6@63.402,76.008
  Bottom Layer w0.254: TP2.1@58.142,69.737 61.137,69.737 v1(61.5,70.1)
pads on no net: PS1.3 PS1.5 Q1.3 Q1.5 Q2.3 Q2.5 Q3.3 Q3.5 Q4.3 Q4.5 Q5.3 Q5.5 Q6.3 Q6.5 Q7.3 Q7.5 Q8.3 Q8.5 U4.5 U4.6 U6.3V3_EN U6.ADC_VREF U6.GP8 U6.GP9 U6.GP10 U6.GP11 U6.GP12 U6.GP13 U6.GP14 U6.GP15 U6.GP20 U6.GP21 U6.GP22 U6.GP26_A0 U6.GP27_A1 U6.GP28_A2 U6.RUN U6.VBUS

## Polygon pours and split planes (outlines as drawn)
AGND on Bottom Layer "NONET_L-01_P-001" (solid, pour order 1): 0,100 62,100 62,82 72,82 74.8,79.2 74.8,55.8 70,51 36.3,51 26.3,61 0,61
DGND on Bottom Layer "NONET_L-01_P-001" (solid, pour order 2): 0,47 56.4,47 61,42.4 61,7.9 0,7.9
NetC2_1 on Top Layer "NONET_L-01_P-001" (solid, pour order 3): 68.7,64.4 69.4,64.4 69.4,62.2 69.5,62.1 72.7,62.1 72.7,63.4 73.1,63.8 74,63.8 74,65.1 73.9,65.2 70.4,65.2 69.6,66 68.7,66
N on Top Layer "NONET_L-01_P-001" (solid, pour order 0): 67.088,93.7 68.5,93.7 68.5,92.53 69.788,91.342 69.788,91.1 68.988,90.3 67.088,90.3

## Keep-outs
Keep-Out Layer:
  region: 14.2,17.6 9.534,12.934 9.534,12.464 12.604,12.464 15.94,15.8 49.9,15.8 50.2,16.1 50.2,17.9

## Silkscreen, mask and mechanical layers (free items; w line width, h text height)
Top Overlay:
  text "2A" at 22.654,96.754 h1.2
  text "L_OUT" at 189.646,93.454 h1.2 r90
  text "100mR  / Shunt" at 70,92.1 h1.2
  text "N" at 196.446,86.454 h1.2 r90
  text "L_IN" at 2.954,86.354 h1.2
  text "x" at 108.178,56.878 h8
  text "x" at 148.478,56.878 h8
  text "x" at 192.278,56.878 h8
  text "(4.7uF)" at 75.954,52.554 h1.2
  text "(10uF)" at 112.954,52.554 h1.2
  text "(22uF)" at 155.454,52.554 h1.2
  text "x" at 91.478,27.278 h8
  text "Experimental SELV  / PFC System" at 105.1,24.8 h7
  text "(44uF)" at 185.054,14.154 h1.2
  text "Designed by Ebubekir Tasci" at 33.8,3.1 h1.2
Bottom Overlay:
  text "L" at 198.346,96.346 h1.52 r90
  text "N" at 1.554,95.154 h1.52 r270
  text "N" at 198.246,91.846 h1.52 r90
  text "L" at 1.454,90.654 h1.52 r270
  text "Use external step-down transformer!" at 14.4,85.6 h1.2 r270
  text "24VAC Input Only" at 7.3,80 h1.2 r270
  text "H" at 11.717,76.467 h12 r270
Mechanical 1:
  circle w0.1: c65,45 r1.65
  circle w0.1: c150,90 r1.65
  circle w0.1: c195,5 r1.65
  circle w0.1: c5,5 r1.65